# Altium PCB PCB_Palm_v2.2.PcbDoc (part 3 of 3)
Units mil, origin at the board's own origin, x right, y up, seen from the top; angles counter-clockwise.
Board outline 1773 x 1966 mil, 4 copper layers (Top Layer, Signal_1, Signal_2, Bottom Layer), stack 62.008 mil thick; 124 components, 104 nets, 490 pads, 277 vias.
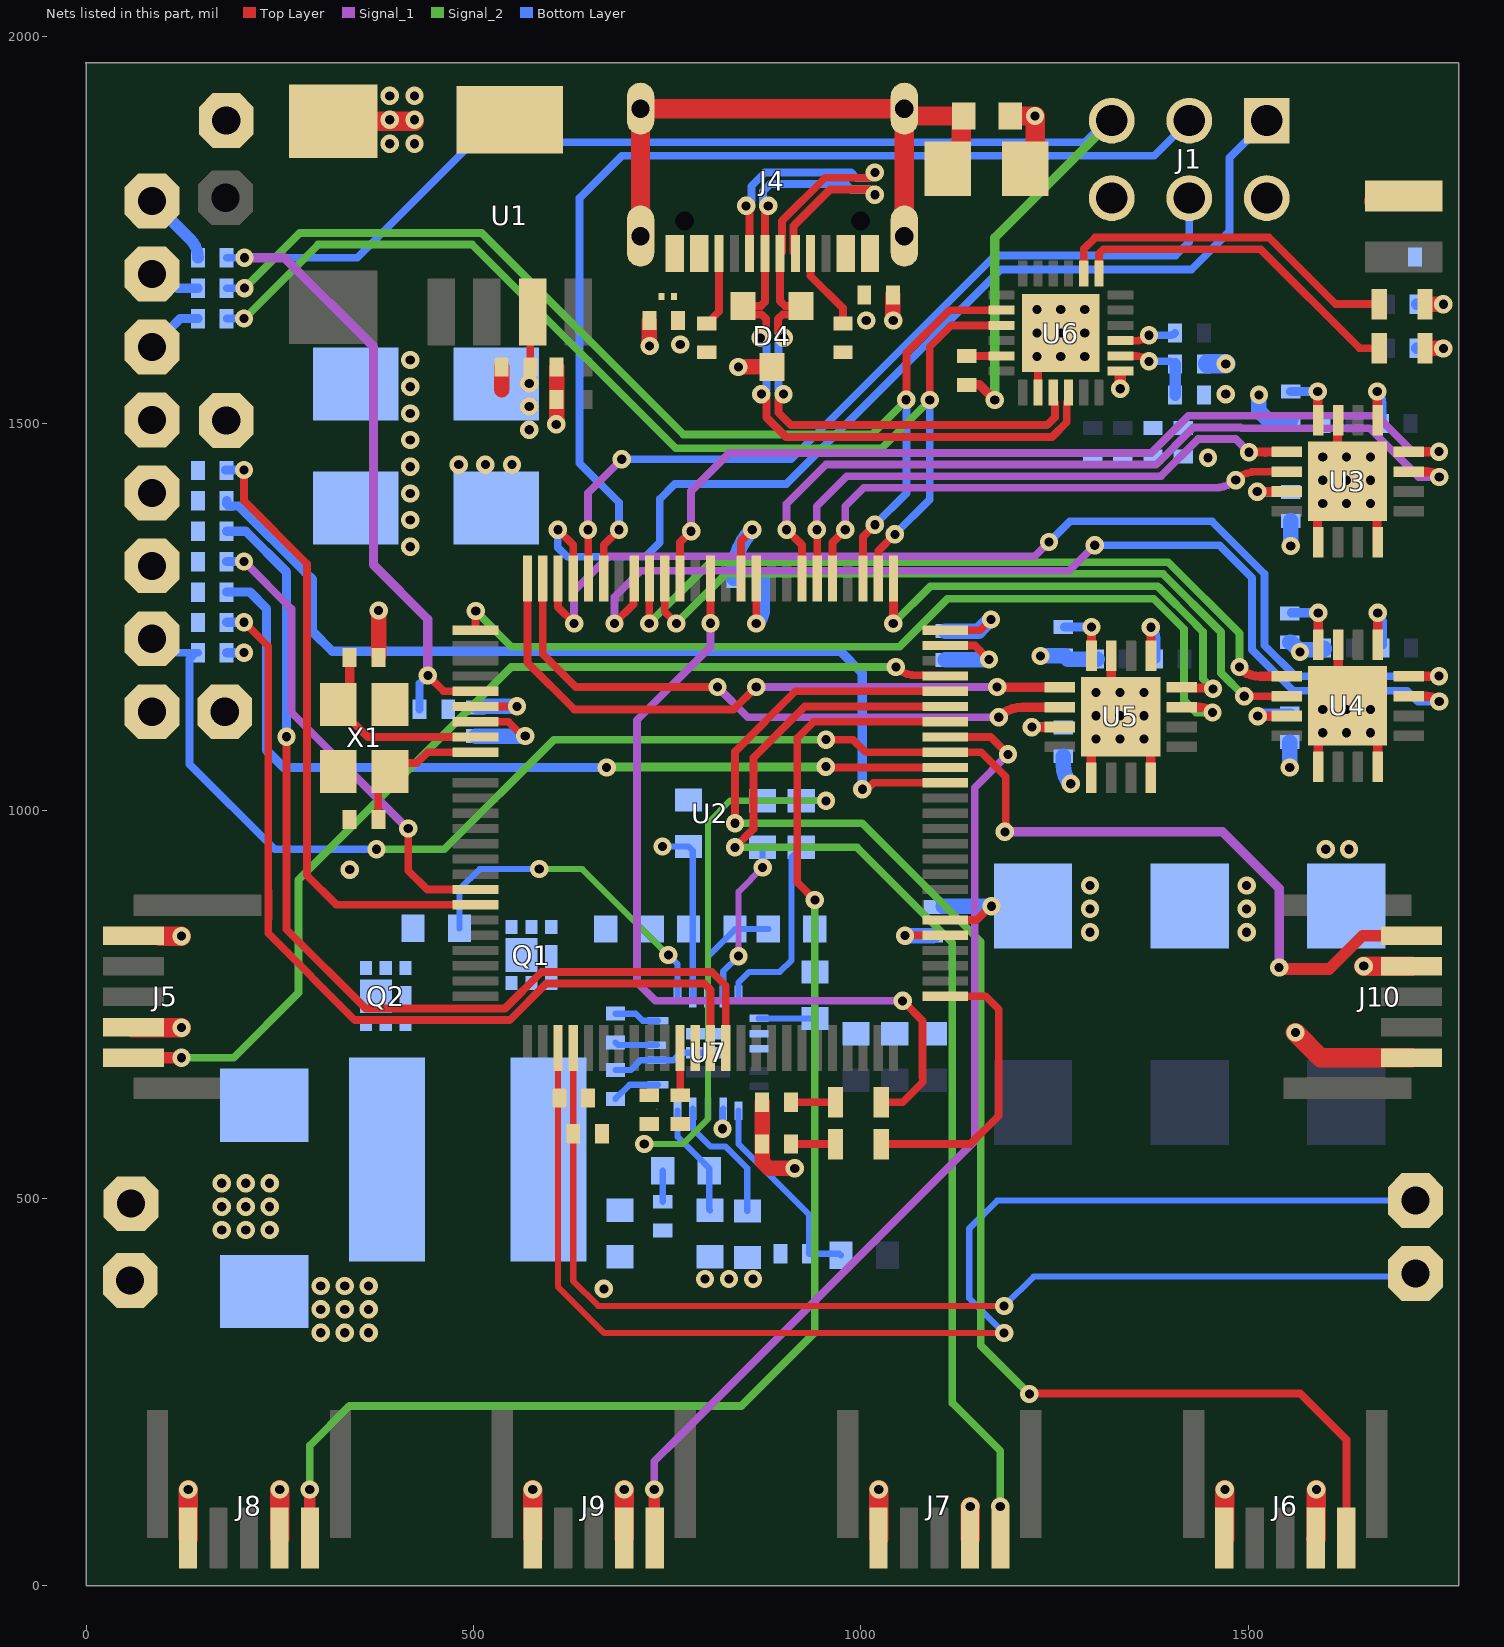
[diagram p4: the nets of this part, all layers, seen from the top]

## Via types
v1: diameter 23.62, hole 11.81, Top Layer to Bottom Layer, tented both sides, 277 vias

## Nets (pads, with @x,y where several pads share a name; then routed paths per layer and width w, separated by ;. In a path a pad name is that pad's centre, name@x,y a point inside that pad or via, vN(x,y) a via of type N, cw(c..) or ccw(c..) an arc to the next point about the centre after c; other vN are vias at no path point) (continued)
GND: C1.1 C2.1 C3.1 C4.2 C5.2 C6.2 C7.2 C8.2 C9.2 C10.2 C12.1 C13.1 C15.1 C16.1 C17.1 C19.1 C20.1 C21.1 C22.2 C23.2 C25.2 C26.2 C27.2 C28.2 C30.1 C31.2 C32.2 C33.2 C34.1 C35.1 C36.1 C39.2 C40.1 C41.2 C43.1 D1.2 D4.3 J1.6 J4.A1/B12 J4.B1/A12 J5.5 J6.5 J7.5 J8.5 J9.5 J10.5 J11.1 J21.1 J22.1 J25.1 Q1.4 Q1.7 R2.1 R3.1 R4.1 R8.2 R9.2 R24.1 R29.1 R33.1 R34.1 R35.1 R36.1 Ra.1 U1.5 U2.11 U2.32 U2.62 U2.81 U2.99 U3.1 U3.4 U3.11 U3.17 U4.1 U4.4 U4.11 U4.17 U5.1 U5.4 U5.11 U5.17 U6.2 U6.25 U7.7 U7.9 U7.10 U7.15 U7.24 X1.2 X1.4 | length 2748.2
  Top Layer w10: U2.32@502.85,1115.11 545.2,1115.11 563.7,1096.61 v1(567,1096.61) ; U2.11@845.37,1300.15 845.37,1348.37 v1(860,1363) ; U2.81@1109.15,859.2 1149.68,859.2 1167.48,877.01 v1(1168.81,877.01) ; U2.99@1109.15,1213.54 1147.31,1213.54 v1(1165.39,1195.45) ; v1(1227.25,1586.69) 1228.07,1586.69 U6.25@1228.7,1587.31 ; U6.2@1228.7,1540.07 U6.25@1228.7,1587.31 ; U6.25@1258.23,1616.84 U6.25@1228.7,1587.31
  Top Layer w12: U5.1@1297.67,1042.94 1297.67,1083.68 U5.17@1335.67,1121.68 ; U5.11@1323.47,1200.42 1323.47,1133.88 U5.17@1335.67,1121.68 ; U5.4@1374.47,1042.94 1374.47,1082.88 U5.17@1335.67,1121.68 ; U3.1@1589.58,1346.88 1589.58,1387.62 U3.17@1627.58,1425.62 ; U4.1@1590.32,1061.16 1590.32,1101.9 U4.17@1628.32,1139.9 ; U3.11@1615.38,1504.36 1615.38,1437.82 U3.17@1627.58,1425.62 ; U4.11@1616.12,1218.64 U4.11@1616.12,1214.58 1616.12,1152.1 U4.17@1628.32,1139.9 ; U3.4@1666.38,1346.88 1666.38,1386.82 U3.17@1627.58,1425.62 ; U4.4@1667.12,1061.16 1667.12,1101.1 U4.17@1628.32,1139.9
  Top Layer w20: C30.1@377.66,1200.44 v1(377.66,1258.66) ; 536.5,1543.5 C1.1@536.5,1573.08 ; v1@607,1501 ccw(c605.79,1502.21) v1@607.5,1502.21 ; v1@607.5,1499 C3.1@607.5,1531.08 C2.1@607.5,1573.08 ; v1@727,1600.5 C23.2@727,1633 ; v1(842,1573) 842.26,1573.26 D4.3@885.6,1573.26 ; R3.1@872.64,624.08 R4.1@872.64,570 872.64,547.65 881.64,538.65 v1(914.83,538.65) ; C22.2@1041.5,1666 1041.5,1633.5 v1(1042,1633)
  Top Layer w25: J5.5@95.96,838.34 v1(123.29,838.34) ; J8.5@131.9,60.97 v1(131.9,124) ; C10.2@312.16,1894 316,1890.16 C10.2@319,1890.16 v1@424,1890.16 ; U1.5@542.06,1890.16 U1.5@544,1892.1 ; J9.5@576.57,60.97 v1(576.57,124) ; J7.5@1023.23,60.97 v1(1023.23,124) ; Ra.1@1193,1897 v1(1225,1897) 1225,1842 C17.1@1212,1829 ; J6.5@1469.9,60.97 v1(1469.9,124) ; v1(1561,714) 1593.5,681.5 J10.5@1711.01,681.5
  Bottom Layer w8: v1(821.39,589.68) 821.95,590.25 821.95,615 U7.15@822.51,615.56
  Bottom Layer w20: C7.2@502.85,1096.61 v1(567,1096.61) ; C5.2@835.87,1300.15 835.87,1304.75 cw(c918.26,1304.75) C5.2@836.08,1310.55 ; C5.2@836.08,1300 C5.2@836.08,1310.55 ; v1(860,1363) ccw(c918.26,1304.75) 852.95,1354.97 ccw(c918.26,1304.75) C5.2@836.08,1310.55 ; 1106.33,877.01 v1(1168.81,877.01) ; C6.2@1109.17,1195.02 1109.39,1195.23 1165.18,1195.23 v1(1165.39,1195.45) ; v1(1232,1200) 1260.85,1200 C20.1@1261.41,1200.56 1262.91,1200.56 1267.41,1196.06 C19.1@1304.91,1196.06 ; v1(1514,1537) 1514,1516.22 1525.72,1504.5 C13.1@1555,1504.5 ; C16.1@1553.74,1217.72 1555.24,1217.72 1563.42,1209.53 1566.82,1206.13 v1(1566.82,1205) 1567.8,1205 1570.52,1207.72 1597.24,1207.72 1598.24,1208.72 C15.1@1598.24,1210.22
  Bottom Layer w25: R24.1@1448,1577 v1(1471,1577)
  other v1: 303,326.43 333.88,326.43 364.75,326.43 303,356.59 333.88,356.59 364.75,356.59 303,386.75 333.88,386.75 364.75,386.75 799,395.75 829.88,395.75 860.75,395.75 1295.75,843.43 1498,843.43 1295.75,873.59 1498,873.59 1295.75,903.75 1498,903.75 340.32,924.17 1600.14,950.47 1630.3,950.47 1303.59,1092.75 1334.47,1092.75 1365.34,1092.75 1596.25,1100.9 1627.13,1100.9 1658,1100.9 1303.59,1122.9 1334.47,1122.9 1365.34,1122.9 1596.25,1131.06 1627.13,1131.06 1658,1131.06 1303.59,1153.06 1334.47,1153.06 1365.34,1153.06 1596.25,1396.69 1627.13,1396.69 1658,1396.69 1596.25,1426.84 1627.13,1426.84 1658,1426.84 1448.13,1455.8 1596.25,1457 1627.13,1457 1658,1457 607,1499 1258.13,1586.69 1289,1586.69 727.5,1600 1227.25,1616.84 1258.13,1616.84 1289,1616.84 1227.25,1647 1258.13,1647 1289,1647 392,1861.25 424,1861.25 392,1892.12 424,1892.12 392,1923 424,1923
LED_PIN: LED2.1 U2.76 | length 371.4
  Top Layer w10: LED2.1@1035.07,570 1141.54,570 1178,606.46 1178,744 1161.22,760.78 U2.76@1109.15,760.78
MEGA_MISO: J1.1 U2.22 | length 1335.7
  Top Layer w10: v1(609,1363) 628.84,1343.17 U2.22@628.84,1300.15
  Bottom Layer w10: v1(609,1363) 609,1340 621,1328 722,1328 740.5,1346.5 740.5,1402.5 760,1422 904,1422 1181,1699 1427,1699 1476,1748 1476,1843 J1.1@1524,1891
MEGA_MOSI: J1.4 U2.21 | length 1077.2
  Top Layer w10: v1@648.26,1363 648.26,1300.41 U2.21@648.52,1300.15
  Signal_1 w10: v1(648,1363) 648,1410.47 v1(691.53,1454)
  Bottom Layer w10: v1(691.53,1454) 910.35,1454 1173.35,1717 1406.65,1717 1424,1734.35 J1.4@1424,1791
MEGA_RST: C24.2 C29.2 J1.5 R1.2 U2.30 | length 2465.9
  Top Layer w10: v1(441.23,1174.9) 441.23,1174.77 461.52,1154.48 U2.30@502.85,1154.48
  Top Layer w12: C29.2@1137,1550 1153.29,1550 v1@1176.87,1526.41
  Signal_1 w12: v1(204.5,1714) 256,1714 371,1599 371,1317.69 441.23,1247.45 v1(441.23,1174.9)
  Signal_2 w12: v1@1173,1539 1173,1740 J1.5@1324,1891
  Bottom Layer w10: C24.2@181.5,1714 v1(204.5,1714) 350,1714 499.04,1863.04 1288.99,1863.04 1316.95,1891 J1.5@1324,1891 ; R1.2@430.5,1131 430.5,1164.31 441.1,1174.9 v1(441.23,1174.9)
  other v1: 1173,1530.29
MEGA_SCK: J1.3 U2.20 | length 1348.6
  Top Layer w10: U2.20@668.21,1300.15 668.21,1343.17 v1(688.04,1363)
  Bottom Layer w10: v1(688.04,1363) 688.04,1397.96 637,1449 637,1791 691.75,1845.75 1378.75,1845.75 J1.3@1424,1891
MOTOR1_CLOSE: U2.6 U3.13 | length 741.4
  Top Layer w10: U2.6@943.8,1300.15 v1@943.8,1362.48
  Top Layer w12: v1@1501.21,1463.21 1522.21,1463.21 ; 1522,1463 1522.21,1463.21 ; U3.13@1549.05,1463.21 1522.21,1463.21
  Signal_1 w10: v1(943.28,1363) 943.28,1393.28 982,1432 1387.43,1432 1435.43,1480 1484,1480 v1(1501,1463)
MOTOR1_OPEN: U2.5 U3.14 | length 684.4
  Top Layer w10: U2.5@963.48,1300.15 963.48,1346.44 v1(980.04,1363) ; v1(1484,1427) cw(c1510.12,1400.88) 1510.12,1437.82 U3.14@1549.58,1437.82
  Signal_1 w10: v1(980.04,1363) 980.04,1393.04 1004,1417 1457.03,1417 ccw(c1457.03,1457.97) 1473.99,1420.68 ccw(c1457.03,1457.97) v1@1483.85,1427
MOTOR1_SENSE: J5.1 U2.97 | length 1346.8
  Top Layer w10: v1(1045.27,1185.73) ccw(c1071,1211.45) 1071,1175.07 1108.24,1175.07 U2.97@1109.15,1174.17
  Top Layer w15: J5.1@60.79,681.49 v1@124.29,681.49
  Signal_2 w10: v1(123.29,681.49) 190.49,681.49 274.28,765.28 274.28,911.05 548.95,1185.73 v1(1045.27,1185.73)
MOTOR2_CLOSE: U2.15 U3.8 | length 1183.1
  Top Layer w10: U2.15@766.63,1300.15 766.63,1346.63 v1(781,1361)
  Top Layer w12: U3.8@1706.32,1463.42 U3.8@1706.61,1463.71 ; U3.8@1707.06,1463.42 v1@1746.16,1463.42
  Signal_1 w10: v1(781,1361) 781,1413 830,1462 1375,1462 1423,1510 1666,1510 1712.29,1463.71 v1(1746.45,1463.71)
MOTOR2_OPEN: U2.7 U3.7 | length 1057.2
  Top Layer w10: v1(904.28,1363) 924.11,1343.17 U2.7@924.11,1300.15
  Top Layer w12: U3.7@1706.32,1437.82 U3.7@1707.21,1436.93 ; U3.7@1707.06,1437.82 1730.28,1437.82 cw(c1730.28,1414.54) v1(1746.74,1431)
  Signal_1 w10: v1(904.28,1363) 904,1363.28 904,1396 955,1447 1325,1447 1381.21,1447 1428.21,1494 1429.21,1495 1490.21,1495 1491.21,1494 1657,1494 1720,1431 v1(1746.74,1431)
MOTOR2_SENSE: J6.1 U2.96 | length 1948.7
  Top Layer w10: v1(837.75,984) 837.75,1076.75 915.48,1154.48 U2.96@1109.15,1154.48 ; v1(1217.62,247.38) 1218.24,248 1567.34,248 1626.88,188.46 J6.1@1626.88,60.45
  Signal_2 w10: v1(837.75,984) 1002,984 1155,831 1155,310 v1(1217.62,247.38)
MOTOR3_CLOSE: U2.17 U4.13 | length 1000.1
  Top Layer w10: v1(727,1242) U2.17@727,1299.89
  Top Layer w12: v1(1488.85,1185.85) 1488.85,1185 1488,1185 ccw(c1515.44,1212.44) 1515.44,1173.64 U4.13@1549.58,1173.64
  Signal_2 w10: v1(727,1242) 806,1321 1397,1321 1488.85,1229.15 v1(1488.85,1185.85)
MOTOR3_OPEN: U2.16 U4.14 | length 975
  Top Layer w10: U2.16@746.95,1300.15 746.95,1257.06 v1(762,1242) ; v1(1495,1148) U4.14@1549.57,1148.02
  Signal_2 w10: v1(762,1242) 826,1306 1390,1306 1465,1231 1465,1178 v1(1495,1148)
MOTOR3_SENSE: J7.1 U2.95 | length 1527.1
  Top Layer w10: v1(837.75,953) 861.5,976.75 861.5,1068.5 927.8,1134.8 U2.95@1109.15,1134.8
  Top Layer w15: J7.1@1180.08,60.32 1180.16,60.4 1180.16,102.11 v1(1180.08,102.19)
  Signal_2 w10: v1(837.75,953) 995,953 1118.08,829.92 1118.08,235.92 1180.08,173.92 v1(1180.08,102.19)
MOTOR4_CLOSE: U2.23 U4.8 | length 1438.5
  Top Layer w10: U2.23@609.15,1300.15 609.15,1262.83 v1(629.98,1242)
  Top Layer w12: U4.8@1707.06,1173.64 v1@1746.16,1173.64
  Signal_1 w10: v1(629.98,1242) 629.98,1283.98 674.7,1328.7 1224.7,1328.7 v1(1243,1347)
  Bottom Layer w10: v1(1243,1347) 1270,1374 1453.21,1374 1521,1306.21 1521,1214 1561.07,1173.93 v1(1746.45,1173.93)
MOTOR4_OPEN: U2.18 U4.7 | length 1374.8
  Top Layer w10: v1(682,1242) 706.67,1266.67 706.67,1299.24 U2.18@707.58,1300.15
  Top Layer w12: U4.7@1707.06,1148.04 1730.28,1148.04 cw(c1730.28,1124.75) v1(1746.74,1141.22)
  Signal_1 w10: v1(682,1242) 682,1276 716,1310 1269,1310 v1(1302,1343)
  Bottom Layer w10: v1(1302,1343) 1463,1343 1505,1301 1505,1208 1558,1155 1705.39,1155 1719.17,1141.22 v1(1746.74,1141.22)
MOTOR4_SENSE: J8.1 U2.94 | length 1810.4
  Top Layer w10: v1(940.68,885.01) 918,907.7 918,1094 939.11,1115.11 U2.94@1109.15,1115.11
  Top Layer w15: J8.1@288.75,60.32 v1@288.75,125
  Signal_2 w10: v1(288.75,124) 288.75,180.75 340,232 846,232 940.68,326.68 v1(940.68,885.01)
MOTOR5_CLOSE: U2.25 U5.13 | length 832.5
  Top Layer w10: U2.25@569.78,1300.15 569.78,1191.22 630,1131 836.06,1131 v1(865.06,1160)
  Top Layer w12: v1@1176.52,1159.48 U5.13@1256.93,1159.48
  Signal_1 w10: v1(865.06,1160) v1(1176,1160)
MOTOR5_OPEN: U2.24 U5.14 | length 802.2
  Top Layer w10: U2.24@589.47,1300.15 589.47,1202.53 632,1160 v1(815,1160)
  Top Layer w12: v1(1178,1121) cw(c1209.24,1089.76) 1209.24,1133.94 U5.14@1256.87,1133.94
  Signal_1 w10: v1(815,1160) 854,1121 v1(1178,1121)
MOTOR5_SENSE: J9.1 U2.93 | length 1291.9
  Top Layer w10: U2.93@1109.15,1095.43 1167.58,1095.43 v1(1190,1073)
  Top Layer w15: J9.1@733.42,60.32 v1(733.42,124)
  Signal_1 w10: v1(733.42,124) 733.42,160.42 763,190 1147,574 1147,1030 v1(1190,1073)
MOTOR6_CLOSE: U2.1 U5.8 | length 623.1
  Top Layer w12: v1(1042,1242) 1042.22,1242.22 U2.1@1042.22,1300.15 ; U5.8@1414.41,1159.48 1415.15,1158.74 1454.26,1158.74 1455,1158 v1(1454.58,1157.58)
  Signal_2 w10: v1(1042,1242) 1090,1290 1383,1290 1384,1289 1384.21,1289 1432.34,1240.87 1432.34,1240.66 1441.59,1231.41 1441.59,1170.57 v1(1454.58,1157.58)
MOTOR6_OPEN: U2.26 U5.7 | length 1167.5
  Top Layer w10: v1(503,1258) 502.85,1257.85 U2.26@502.85,1233.22 U2.26@503.21,1233.58
  Top Layer w12: U5.7@1414.41,1133.88 1437.62,1133.88 cw(c1437.62,1110.6) v1(1454.08,1127.06)
  Signal_2 w10: v1(503,1258) 549,1212 1050,1212 1112,1274 1378,1274 1417.34,1234.66 1417.34,1142.55 1432.83,1127.06 v1@1444.08,1127.06
MOTOR6_SENSE: J10.1 J23.1 R16.1 U2.92 | length 2140
  Top Layer w10: v1(955,1092) 990,1092 1006.26,1075.74 U2.92@1109.15,1075.74 1155.26,1075.74 1187,1044 1187,974 v1(1186,973)
  Top Layer w15: v1(1540,798) 1542,796 1604.68,796 1647.67,838.99 J10.1@1712.35,838.99
  Signal_1 w12: v1(1186,973) 1466.98,973 1540,899.98 v1(1540,798)
  Signal_2 w10: v1(374.94,950.49) 462.49,950.49 604,1092 v1(955,1092)
  Bottom Layer w10: J23.1@85,1222.29 99.79,1222.29 118.07,1204 R16.1@141.57,1204 ; R16.1@144.5,1204 R16.1@141.57,1204 ; v1(374.94,950.49) 243.51,950.49 133.57,1060.43 133.57,1196 R16.1@141.57,1204
MUSCLE_SENSE1: R13.1 U2.91 | length 1129.4
  Top Layer w10: v1(954.97,1057.2) 956.12,1056.06 U2.91@1109.15,1056.06
  Signal_2 w12: v1(672,1056.06) 672.57,1056.63 954.4,1056.63 v1(954.97,1057.2)
  Bottom Layer w12: R13.1@181.5,1282.47 211.53,1282.47 233,1261 233,1078.38 255.32,1056.06 v1(672,1056.06)
MUSCLE_SENSE2: R11.1 U2.90 | length 1214.4
  Top Layer w10: v1(1002,1028) 1008,1028 1016.37,1036.37 U2.90@1109.15,1036.37
  Bottom Layer w12: R11.1@181.5,1400.17 181.5,1396.67 184.5,1393.67 197.38,1393.67 283,1308.04 292.35,1298.69 292.35,1231.45 317.8,1206 973.73,1206 1002,1177.73 v1(1002,1028)
NetC11_1: C11.1 U3.9 | length 79.9
  Top Layer w12: U3.9@1666.58,1504.36 v1(1666.58,1541.36)
  Bottom Layer w12: v1(1666.58,1541.36) cw(c1652.3,1527.07) 1672.5,1527.07 C11.1@1672.5,1500
NetC13_2: C13.2 U3.12 | length 71.6
  Top Layer w12: U3.12@1589.78,1504.36 v1(1589.78,1541.36)
  Bottom Layer w12: C13.2@1555.14,1541.36 v1(1589.78,1541.36)
NetC14_1: C14.1 U4.9 | length 84
  Top Layer w12: U4.9@1667.32,1214.58 v1(1667.32,1255.64)
  Bottom Layer w12: v1(1667.32,1255.64) cw(c1653.04,1241.35) 1673.24,1241.35 C14.1@1673.24,1214.28
NetC16_2: C16.2 U4.12 | length 71.6
  Top Layer w12: U4.12@1590.52,1218.64 v1(1590.52,1255.64)
  Bottom Layer w12: C16.2@1555.88,1255.64 v1(1590.52,1255.64)
NetC18_1: C18.1 U5.9 | length 80.3
  Top Layer w12: v1(1374.39,1237.14) 1374.67,1237.14 U5.9@1374.67,1200.42
  Bottom Layer w12: v1(1374.39,1237.14) 1374.67,1237.42 cw(c1360.38,1223.13) 1380.58,1223.13 C18.1@1380.58,1196.06
NetC20_2: C20.2 U5.12 | length 71.6
  Top Layer w12: U5.12@1297.87,1200.42 v1(1297.87,1237.42)
  Bottom Layer w12: C20.2@1263.23,1237.42 v1(1297.87,1237.42)
NetC24_1: C24.1 J17.1 | length 96.6
  Bottom Layer w15: J17.1@85,1787.43 134.65,1737.78 cw(c110.88,1714) C24.1@144.5,1714
NetC29_1: C29.1 U6.23 | length 44.5
  Top Layer w10: C29.1@1137,1587.31 U6.23@1181.46,1587.31
NetC37_1: C37.1 U7.22 | length 54.9
  Bottom Layer w8: C37.1@683.33,701.24 686.82,697.75 U7.22@736.78,697.75
NetC37_2: C37.2 L1.1 Q1.1 Q1.2 Q1.5 Q1.6 Q1.8 Q2.4 Q2.7 U7.23 | length 58.7
  Bottom Layer w8: C37.2@683.33,738.24 709.64,738.24 718.64,729.24 U7.23@738.26,729.24
NetC38_1: C38.1 L1.2 U7.21 U7.25 | length 128.8
  Bottom Layer w8: C38.1@683.33,665.4 703.02,665.4 715.68,678.06 U7.21@736.78,678.06 757.83,678.06 767.67,687.9 U7.25@802.83,687.9
NetC38_2: C38.2 U7.20 | length 62.5
  Bottom Layer w8: C38.2@683.33,628.4 701.49,646.56 U7.20@738.26,646.56
NetC42_1: C42.1 R36.2 | length 40
  Bottom Layer w8: R36.2@744.48,495.51 C42.1@744.48,535.51
NetC42_2: C42.2 C43.2 U7.18 | length 143
  Bottom Layer w8: U7.18@763.46,613.1 763.46,579.53 C42.2@804.48,538.51 ; C42.2@804.48,535.51 804.48,485.58 C43.2@805.55,484.51
NetJ4_A5: J4.A5 R8.1 | length 96.4
  Top Layer w10: J4.A5@935,1708 935,1691 977,1649 R8.1@977,1629
NetJ4_B5: J4.B5 R9.1 | length 97.2
  Top Layer w10: R9.1@801,1629 817.1,1645.1 J4.B5@817.1,1719.5
NetJ14_1: J14.1 R18.2 | length 67.2
  Bottom Layer w12: J14.1@85,1693.22 99.2,1693.22 117.68,1674.75 R18.2@144.5,1674.75
NetJ15_1: J15.1 R10.2 R11.2 R12.2
NetJ16_1: J16.1 R19.2 | length 74.6
  Bottom Layer w12: J16.1@85,1599.02 121.48,1635.5 R19.2@144.5,1635.5
NetJ18_1: J18.1 R13.2 R14.2 R15.2
NetLED1_2: LED1.2 R3.2 | length 57.8
  Top Layer w10: R3.2@909.64,624.08 909.72,624 LED1.2@967.42,624
NetLED2_2: LED2.2 R4.2 | length 57.8
  Top Layer w10: R4.2@909.64,570 LED2.2@967.42,570
NetLED3_1: LED3.1 R21.2 | length 59.3
  Top Layer w20: LED3.1@1728.3,1654.16 1728.46,1654 v1(1752,1654) v1@1753,1654
  Bottom Layer w15: R21.2@1717.5,1654 v1(1752,1654)
NetLED4_1: LED4.1 R22.2 | length 59.3
  Top Layer w20: LED4.1@1728.3,1597.16 1728.38,1597.08 1752.92,1597.08 v1@1753,1597
  Bottom Layer w15: R22.2@1717.5,1597 v1(1752,1597)
NetQ1_3: Q1.3 R27.2
NetQ2_3: Q2.3 R26.2
NetR5_2: R5.2 U3.15 | length 79.8
  Top Layer w12: v1(1511.73,1412.11) 1548.73,1412.11 U3.15@1548.84,1412.22
  Bottom Layer w12: v1(1511.73,1412.11) R5.2@1554.39,1412.11
NetR6_2: R6.2 U4.15 | length 80.7
  Top Layer w12: v1(1512.47,1122.39) U4.15@1549.47,1122.39
  Bottom Layer w12: v1(1512.47,1122.39) cw(c1522.13,1112.73) 1522.13,1126.39 R6.2@1555.13,1126.39
NetR7_2: R7.2 U5.15 | length 78.7
  Top Layer w12: v1(1220.82,1108.17) U5.15@1256.82,1108.17
  Bottom Layer w12: v1@1219.82,1108.17 v1(1220.82,1108.17) R7.2@1262.47,1108.17
NetR20_1: R20.1 U6.9 | length 73.4
  Top Layer w10: U6.9@1335,1607 1355.1,1607 ccw(c1355.1,1630.9) v1(1372,1614)
  Bottom Layer w10: v1(1372,1614) 1398.87,1614 ccw(c1398.87,1623.7) R20.1@1405.73,1616.84
NetR23_2: R23.2 R24.2 U6.8 | length 113.5
  Top Layer w10: U6.8@1335,1587.31 1355.1,1587.31 cw(c1355.1,1563.42) v1(1372,1580.31)
  Bottom Layer w10: v1(1372,1580.31) 1397.35,1580.31 cw(c1397.35,1568.46) R24.2@1405.73,1576.84
  Bottom Layer w15: R23.2@1405.73,1536.84 R24.2@1405.73,1576.84
NetR26_1: R26.1 U7.2 | length 433.1
  Signal_2 w8: v1(585,925) 640.64,925 v1(751.64,814)
  Bottom Layer w8: R26.1@482,848.51 482,899 508,925 v1(585,925) ; v1(751.64,814) 763.46,802.18 U7.2@763.46,762.71
NetR27_1: R27.1 U7.1
NetR28_1: R28.1 R29.2 U7.4 | length 144.7
  Bottom Layer w8: U7.4@802.83,760.25 802.83,812.59 R28.1@837.75,847.51 R29.2@880.68,847.51
NetR30_2: R30.2 U7.5 | length 213.8
  Signal_1 w8: v1(842.2,812.59) 842.2,895.9 v1(873.3,927)
  Bottom Layer w8: U7.5@822.51,760.25 822.51,792.9 v1(842.2,812.59) ; v1(873.3,927) R30.2@873.3,953
NetR31_2: R31.2 U7.6 | length 247.2
  Bottom Layer w8: U7.6@842.2,762.71 842.2,778.6 855.8,792.2 895.68,792.2 910.68,807.2 910.68,940.5 R31.2@923.18,953
NetR32_1: R32.1 R34.2 U7.14 | length 264.2
  Bottom Layer w8: U7.14@842.2,613.1 842.2,569.89 933.33,478.76 R34.2@933.33,428.51 972.33,428.51 R32.1@974.33,426.51
NetR33_2: R33.2 U7.8 | length 72.3
  Bottom Layer w8: U7.8@868.38,732.2 R33.2@940.68,732.2
NetR35_2: R35.2 U7.17 | length 172.6
  Bottom Layer w8: U7.17@783.14,615.56 783.14,589.68 806.15,566.68 825.53,566.68 853.55,538.65 R35.2@853.55,483.51
PALM_LED: LED1.1 U2.13 | length 1093.5
  Top Layer w10: v1(806,1242.26) U2.13@806,1300.15 ; LED1.1@1026.47,624 1054,624 1080,650 1080,656 1079.62,656.38 1079.62,729.25 v1(1054,754.87)
  Signal_1 w10: v1(806,1242.26) 806,1212 711,1117 711,778.93 735.05,754.87 v1(1054,754.87)
PC0: J13.1 R25.2 U2.53 | length 1653.1
  Top Layer w8: 609,644 609,629.5 609,386 669,326 v1(1185,326) ; 609.15,644.15 U2.53@609.15,693.85
  Bottom Layer w8: v1(1185,326) 1140,371 1140,461 1176,497 J13.1@1716,497
PC1: J12.1 R17.2 U2.54 | length 1418.6
  Top Layer w8: U2.54@628.84,693.85 R17.2@628.84,583.5 628.84,393.16 661,361 v1(1185,361)
  Bottom Layer w8: v1(1185,361) 1223,399 1712,399 J12.1@1716,403
PG/CCN: C41.1 R30.1 R31.1 U7.19 | length 723.9
  Signal_2 w8: v1(720.45,570.19) 720.63,570 736,570 770.43,570 802.96,602.53 802.96,984.96 831,1013 v1(955,1013)
  Bottom Layer w8: R30.1@873.3,1013 R31.1@923.18,1013 v1(955,1013)
PRGM_RX: R18.1 U2.3 U6.20 | length 1493.1
  Top Layer w10: U2.3@1002.85,1300.15 1002.85,1354.04 v1(1018.2,1369.39) ; v1(1058.58,1530.71) 1059,1531.13 1059,1591 1114.37,1646.37 U6.20@1181.46,1646.37
  Signal_2 w10: v1(204.5,1674.75) 275.75,1746 510.78,1746 770.78,1486 1014.71,1486 1058.58,1529.86 v1(1058.58,1530.71)
  Bottom Layer w10: R18.1@181.5,1674.75 v1(204.5,1674.75) ; v1(1018.2,1369.39) 1059,1410.19 1059,1530.29 v1(1058.58,1530.71)
PRGM_TX: R19.1 U2.2 U6.21 | length 1511.9
  Top Layer w10: U2.2@1022.54,1300.15 1022.54,1335.54 v1(1044,1357) ; v1(1089,1530.29) 1089,1599.06 1116.63,1626.68 U6.21@1181.46,1626.68
  Signal_2 w10: v1(204,1635.5) 299.5,1731 498.66,1731 761.4,1468.25 1026.97,1468.25 v1(1089,1530.29)
  Bottom Layer w10: R19.1@181.5,1635.5 v1(204,1635.5) ; v1(1044,1357) 1089,1402 v1(1089,1530.29)
RXD3: R15.1 U2.63 | length 1152.3
  Top Layer w10: v1(204,1243.53) 235.04,1212.49 235.04,896.16 235.35,895.86 235.35,860.84 235.04,860.54 235.04,841.96 347,730 547,730 594.19,777.19 797.81,777.19 806,769 U2.63@806,693.85
  Bottom Layer w12: R15.1@181.65,1243.38 v1@203.85,1243.38
RXLED: LED4.2 U6.13 | length 442.7
  Top Layer w10: U6.13@1307.44,1693.61 1307.44,1719.14 1313.3,1725 1516,1725 1643.84,1597.16 LED4.2@1669.24,1597.16
SCL: R14.1 U2.43 | length 606.1
  Top Layer w10: v1(415.91,977.32) 415.91,922.95 440.29,898.57 U2.43@502.85,898.57
  Signal_1 w10: v1(204,1322) 265.07,1260.93 265.07,1127.25 v1@415,977.32
  Bottom Layer w10: R14.1@181.5,1321.7 R14.1@181.65,1321.85 ; v1@203.85,1321.85 v1(204,1322)
  Bottom Layer w12: R14.1@181.65,1321.85 v1@203.85,1321.85
SDA: R12.1 U2.44 | length 814
  Top Layer w10: v1(204,1440) 204,1400 285.04,1318.96 285.04,917.15 323.31,878.89 U2.44@502.85,878.89
  Bottom Layer w12: R12.1@180.1,1440 v1(204,1440)
SHELL: C17.2 J4.S1 J4.S2 J4.S3 J4.S4 Ra.2 | length 830.1
  Top Layer w25: J4.S2@712,1910 715.72,1906.28 J4.S1@715.72,1741.94 ; J4.S2@715.72,1906.5 J4.S3@1056.28,1906.5 J4.S3@1056.28,1901.82 ; J4.S4@1056.28,1741.94 J4.S3@1056.28,1901.82 ; C17.2@1112,1829 1129.5,1846.5 1129.5,1891 1133,1894.5 Ra.2@1133,1897 1061.1,1897 J4.S3@1056.28,1901.82
TXD3: R10.1 U2.64 | length 1283.8
  Top Layer w10: v1@258.65,1102.81 v1(258.65,1095.81) 258.65,847.35 361,745 540.79,745 587.98,792.19 807.81,792.19 825.69,774.31 U2.64@825.69,693.85
  Bottom Layer w12: R10.1@181.5,1360.93 206.07,1360.93 258.65,1308.35 v1(258.65,1095.81)
TXLED: LED3.2 U6.14 | length 454.8
  Top Layer w10: U6.14@1287.76,1693.61 1287.76,1725.35 1302.41,1740 1527,1740 1612.84,1654.16 LED3.2@1669.24,1654.16
USB_D_N: D4.2 J4.A7 J4.B7 U6.4 | length 1123.4
  Top Layer w10.25: v1(870.6,1610.6) 877.97,1617.97 877.97,1634.98 871.97,1640.98 859.21,1640.98 D4.2@848.2,1652 871.17,1652 876.16,1656.99 J4.A7@876.16,1719.5 876.16,1776.53 v1(880.63,1781) ; v1(871.69,1538) 878.38,1531.31 878.38,1507.68 903.31,1482.75 1246.92,1482.75 1265.85,1501.68 1265.85,1527.03 1268.07,1529.24 U6.4@1268.07,1540.07 ; J4.B7@915.53,1719.5 913.31,1721.71 913.31,1755 960.31,1802 1015.31,1802 1022,1795.31 v1(1018.19,1795.31)
  Bottom Layer w10.25: v1(870.6,1610.6) 878.38,1602.82 878.38,1544.69 v1(871.69,1538) ; v1(880.63,1781) 873.94,1787.69 873.94,1800 882.94,1809 957,1809 957.16,1808.84 980.84,1808.84 987.68,1802 1011.5,1802 v1(1018.19,1795.31)
USB_D_P: D4.1 J4.A6 J4.B6 U6.3 | length 1121.9
  Top Layer w10.25: v1(852,1781) 856.47,1776.53 J4.B6@856.47,1719.5 ; v1(900.31,1538) 893.63,1531.31 893.63,1514 909.63,1498 1240.6,1498 1250.6,1508 1250.6,1527.03 1248.39,1529.24 U6.3@1248.39,1540.07 ; v1(900.6,1610.6) 893.22,1617.97 893.22,1634.98 899.23,1640.98 911.98,1640.98 D4.1@923,1652 902,1652 895.84,1658.16 J4.A6@895.84,1719.5 898.06,1721.71 898.06,1761.32 953.99,1817.25 1015.31,1817.25 1022,1823.94 v1(1018.19,1823.94)
  Bottom Layer w10.25: v1(852,1781) 858.69,1787.69 858.69,1806.32 876.62,1824.25 987.32,1824.25 994.16,1817.41 994,1817.25 1011.5,1817.25 v1(1018.19,1823.94) ; v1(900.31,1538) 893.63,1544.69 893.63,1603.63 v1(900.6,1610.6)
VCC: C4.1 C5.1 C6.1 C7.1 C8.1 C9.1 D2.2 D3.2 J1.2 J3.1 J5.2 J6.2 J7.2 J8.2 J9.2 J10.2 J19.1 J20.1 R1.1 R5.1 R6.1 R7.1 R16.2 R17.1 R25.1 U2.10 U2.31 U2.61 U2.80 U2.100 | length 1028.6
  Top Layer w10: U2.31@502.85,1134.8 556.16,1134.8 v1(556.16,1135) ; U2.61@765.73,694.76 U2.61@766.63,693.85 767,694.22 C8.1@767,633 ; v1(865.06,1242) U2.10@865.06,1300.15 ; v1(1057,839) 1057.52,839.52 U2.80@1109.15,839.52 ; U2.100@1109.15,1233.22 1154.22,1233.22 v1(1168,1247)
  Top Layer w25: J5.2@60.26,720.24 v1(123.29,720.24) ; J8.2@250,60.97 v1(250,124) ; J9.2@694.67,60.97 v1(694.67,124) ; J7.2@1141.33,60.97 v1(1141.33,102.19) ; J6.2@1587.35,60.32 1588,60.97 v1(1588,124) ; v1(1649.3,799.61) J10.2@1711.01,799.61 ; J3.1@1662,1787 1671,1796 J3.1@1701,1796
  Bottom Layer w12: R16.2@181.65,1204.15 v1@203.85,1204.15
  Bottom Layer w20: C7.1@504.24,1135 v1(556.16,1135) ; v1(865.06,1242) ccw(c846.19,1260.87) 872.87,1260.87 C5.1@872.87,1300.15 ; v1@1058.99,837.01 1060.99,839.01 C4.1@1093.83,839.01 ; C6.1@1109.17,1232.02 1152.04,1232.02 1167.02,1247 v1(1168,1247) ; R7.1@1261.41,1070.56 1261.41,1058.16 ccw(c1294.16,1058.16) 1263.91,1045.61 ccw(c1294.16,1058.16) 1266.75,1040.23 ccw(c1294.16,1058.16) v1(1271,1035) ; v1(1553.74,1056.15) R6.1@1553.74,1088.72 ; v1(1555,1341.93) R5.1@1555,1374.5
  other v1: 668.38,383.05 204,1204.3 418.42,1340.96 418.42,1375.39 418.42,1409.81 418.42,1444.24 418.42,1478.66 418.42,1513.09 418.42,1547.51 418.42,1581.94
VCC#: C1.2 D3.1 U1.3 | length 81
  Top Layer w10: C1.2@573.5,1563.08 U1.3@573.5,1644.03
  other v1: 572,1492 572,1521.92 572,1551.84
VIN_6V: C39.1 C40.2 J2.1 Q2.1 Q2.2 Q2.5 Q2.6 Q2.8 R28.2 U7.3 | length 229.6
  Bottom Layer w8: v1(744.17,954) C40.2@777.75,954 783.14,948.61 U7.3@783.14,760.25
  other v1: 175.25,459 206.12,459 237,459 175.25,489.16 206.12,489.16 237,489.16 175.25,519.31 206.12,519.31 237,519.31
VUSB: C22.1 C23.1 C25.1 C26.1 D1.1 D2.1 J4.A4/B9 J4.B4/A9 R23.1 U6.7 | length 22.8
  Top Layer w10: C22.1@1003,1667.5 C22.1@1004.5,1666
  Top Layer w15: v1(1335,1545) U6.7@1335,1565.63
  other v1: 481,1447 515.43,1447 549.85,1447 1471,1538 767,1602 1007,1633
X#1: C21.2 U2.34 X1.1 | length 189
  Top Layer w10: C21.2@377.32,988.96 377.32,1035.91 403.38,1061.96 427.2,1061.96 440.98,1075.74 U2.34@502.85,1075.74
X#2: C30.2 U2.33 X1.3 | length 251.4
  Top Layer w10: X1.3@331.42,1127.49 363.48,1095.43 U2.33@502.85,1095.43
  Top Layer w12: X1.3@325.36,1137.49 340.32,1152.45 C30.2@340.32,1197.94
pads on no net: J4.A8 J4.B8 J4.MH J5.MP1 J5.MP2 J6.MP1 J6.MP2 J7.MP1 J7.MP2 J8.MP1 J8.MP2 J9.MP1 J9.MP2 J10.MP1 J10.MP2 U1.2 U2.4 U2.8 U2.9 U2.12 U2.14 U2.19 U2.27 U2.28 U2.29 U2.35 U2.36 U2.37 U2.38 U2.39 U2.40 U2.41 U2.42 U2.45 U2.46 U2.47 U2.48 U2.49 U2.50 U2.51 U2.52 U2.55 U2.56 U2.57 U2.58 U2.59 U2.60 U2.65 U2.66 U2.67 U2.68 U2.69 U2.70 U2.71 U2.72 U2.73 U2.74 U2.75 U2.79 U2.82 U2.83 U2.84 U2.85 U2.86 U2.87 U2.98 U3.6 U4.6 U5.6 U6.1 U6.10 U6.11 U6.12 U6.15 U6.16 U6.17 U6.18 U6.19 U6.22 U6.24 U7.16

## Polygon pours and split planes (outlines as drawn)
VCC on Signal_1 "VCC_L02_P009" (solid, remove dead copper, pour order 9): 0,1966.23 1772,1965.77 1772,0 0,0
6V on Signal_1 "6V_L02_P001" (solid, remove dead copper, pour order 1): 1400,1558 1400,1482 1769,1482 1769,1848 214,1848 137,1848 137,1558
VCC on Signal_2 "VCC_L03_P010" (solid, remove dead copper, pour order 10): 0,1966.23 1772,1965.77 1772,0 0,0
6V on Signal_2 "NONET_L-01_P-001" (solid, remove dead copper, pour order 7): 1458,1269 1278.91,1269 1278.91,1102.27 1278.91,1096 1278.91,1096.86 1278.91,532.43 1772,532.43 1772,1561 1502,1561 1502,1423 1458,1379
VIN_6V on Signal_2 "VIN_6V_L03_P018" (solid, remove dead copper, pour order 18): 797,992 797,442 13,442 13,655 514,655 514,992
VUSB on Signal_2 "VUSB_L03_P002" (solid, remove dead copper, pour order 2): 1110,1713 1493,1713 1493,1462 1458,1427 779,1427 461,1427 461,1806 1110,1806
GND on Top Layer "GND_L01_P012" (solid, remove dead copper, pour order 12): 0,1966.23 1772,1965.77 1772,0 0,0
VUSB on Top Layer "VUSB_L01_P011" (solid, remove dead copper, pour order 11): 995,1622 995,1667 967,1667 967,1742 993,1742 993,1687 1014,1687 1014,1622
VUSB on Top Layer "VUSB_L01_P005" (solid, remove dead copper, pour order 5): 779,1743 779,1676 754,1676 754,1590 779,1590 779,1644 805,1644 805,1743
GND on Bottom Layer "GND_L04_P008" (solid, remove dead copper, pour order 8): 0,1966.23 1772,1965.77 1772,0 0,0
6V on Bottom Layer "6V_L04_P016" (solid, remove dead copper, pour order 16): 1698.28,801 1146,801 1146,680.52 774.58,680.52 774.58,639.68 857.06,639.68 857.06,568.59 1004.33,568.59 1004.33,403 1110,403 1110,545 1698.28,545
NetR27_1 on Bottom Layer "NETR27_1_L04_P017" (solid, remove dead copper, pour order 17): 715.83,744.99 715.83,830.01 715.83,865.01 745.83,865.01 745.83,830.01 748.59,830.01 748.59,744.99
PG/CCN on Bottom Layer "PG/CCN_L04_P015" (solid, remove dead copper, pour order 15): 748.59,630.82 748.59,556.01 706.55,556.01 706.55,469.51 671.55,469.51 671.55,607.2 724.97,607.2 724.97,630.82
NetC37_2 on Bottom Layer "NETC37_2_L04_P014" (solid, remove dead copper, pour order 14): 404.51,773.95 404.51,691.01 339,691.01 339,409 437,409 437,726 582.67,726 582.67,859.28 541.33,859.28 541.33,773.95
VIN_6V on Bottom Layer "VIN_6V_L04_P013" (solid, remove dead copper, pour order 13): 394.67,705 320,705 320,445 11,445 11,835.65 298,835.65 394.67,835.65

## Other copper
Top Layer:
  rectangle net VIN_6V: 16,443 252,590
  rectangle net VCC: 657,383.05 679,642
  rectangle net VCC: 639,617 779.5,642
  rectangle net VCC#: 554,1474 589,1687
  region net 6V: 481,1600 481,1711 259,1711 259,1600
  rectangle net GND: 1175,1789 1254,1918
  rectangle net CP_VDD: 1298,1481 1333.23,1510
  rectangle net CP_VDD: 1281,1481 1314,1558
  region net SHELL: 738,1897.6 695,1897.6 695,1702 738,1702
  region net SHELL: 1078,1861 1078,1943.91 695,1943.91 695,1861
  rectangle net 6V: 612,1600 632.58,1698
  rectangle net GND: 144,1841 620,1944
  rectangle net SHELL: 1035,1702 1149,1944
  rectangle net VCC: 1490,1755 1753,1825
  rectangle net 6V: 625,1508 684,1698
Bottom Layer:
  rectangle net NetC38_1: 547.79,397 659,681.89
  rectangle net NetC38_1: 547.79,655.6 695.83,683.4
  rectangle net NetC37_2: 574.8,726 695.83,747.24
  rectangle net NetQ1_3: 592.51,841.36 685.83,859.28
  rectangle net NetQ2_3: 404.51,788.36 437,866.01
  rectangle net VCC: 456,1118 569,1151
  rectangle net CP_VDD: 1663,1583 1692,1667
  region net MOTOR6_SENSE: 154,1191 154,1216.43 68,1216.43 68,1191
  region net NetJ15_1: 155,1390 155,1430.29 60,1430.29 60,1390
  region net NetJ18_1: 155,1295 155,1336 60,1336 60,1295
  rectangle net NetJ18_1: 134,1230.3 155.5,1335.3
  rectangle net NetJ15_1: 133,1348 155.5,1453
  rectangle net VCC#: 467,1474 590,1600
  rectangle net GND: 1283.23,1445 1465,1470
  rectangle net VUSB: 1427,1482 1485,1554
  rectangle net VUSB: 1360,1482 1450,1507
  rectangle net CP_VDD: 1281,1481 1354,1510
  rectangle net VUSB: 467,1333 587,1461
  rectangle net VCC: 283,1328 434,1606
  pour cut-out: 339,703 339,397 655.83,397 655.83,703.43 339,703.43

## Silkscreen, mask and mechanical layers (free items; w line width, h text height)
Top Overlay:
  lines w5: 126,1243.2 151.61,1268.82 181.29,1268.82
  lines w7: 1211,1918 1242,1918 1257,1903 1257,1775
  text "GND" at 143.73,1934.37 h35
  text "RST" at 3.44,1829.55 h40 r270
  text "RXD" at 3.44,1736.56 h40 r270
  text "6V" at 143.8,1717.41 h35
  text "SPI" at 1370,1690.6 h40
  text "TXD" at 3.45,1642.55 h40 r270
  text "TX" at 1563,1630.21 h40
  text "RX" at 1563,1573.21 h40
  text "VCC" at 3.45,1547.84 h40 r270
  text "GND" at 140,1546.44 h40
  text "TP8" at 3.45,1452.84 h40 r270
  text "TP9" at 3.45,1357.84 h40 r270
  text "MOTOR6_SENSE" at 156.03,1266.42 h40
  text "VCC" at 40.16,1045.44 h40
  text "GND" at 136,1045.44 h40
  text "PALM_LED" at 1044.06,601.6 h45
  text "LED_PIN" at 1044.06,545.6 h45
  text "PC0" at 1586.5,475.44 h40
  text "VIN-6V" at 102.36,471.44 h40
  text "PC1" at 1587.16,381.44 h40
  text "GND" at 102.33,373.62 h40
Bottom Overlay:
  drawing of 2581 lines, arcs and shapes, not listed
  text "GND" at 343.6,1853 h35
  text "6V" at 342.95,1752.5 h35
  text "~" at 211.71,1169.97 h70
  text "~" at 21.26,689.97 h70
  text "V2.2" at 1771.57,2.7 h45
Board Outline:
  circle w20: c1322.5,78.75 r39.37
  circle w20: c1693.25,1887.25 r39.37
  circle w20: c78.75,1887.25 r39.37
  circle w20: c437,78.75 r39.37
  circle w20: c879.75,78.75 r39.37
  lines w20: 0,0 1772,0 1772,1966 0,1966 0,0
Fabrication:
  drawing of 295 lines, arcs and shapes, not listed
  text "Layer" at 1974.34,4171 h60
  text "Name" at 2384.26,4171 h60
  text "Material" at 3314,4171 h60
  text "Thickness" at 4173.77,4171 h60
  text "Constant" at 4823.6,4171 h60
  text "Board Layer Stack" at 5393.46,4171 h60
  text "Top Overlay" at 2384.26,4051 h60
  text "Top Solder" at 2384.26,3931 h60
  text "Solder Resist" at 3314,3931 h60
  text "0.39mil" at 4173.77,3931 h60
  text "3.5" at 4823.6,3931 h60
  text "1" at 1974.34,3811 h60
  text "Top Layer" at 2384.26,3811 h60
  text "1.38mil" at 4173.77,3811 h60
  text "Dielectric 2" at 2384.26,3691 h60
  text "PP-006" at 3314,3691 h60
  text "8.27mil" at 4173.77,3691 h60
  text "4.1" at 4823.6,3691 h60
  text "2" at 1974.34,3571 h60
  text "Signal_1" at 2384.26,3571 h60
  text "CF-004" at 3314,3571 h60
  text "0.39mil" at 4173.77,3571 h60
  text "Dielectric 1" at 2384.26,3451 h60
  text "FR-4" at 3314,3451 h60
  text "41.93mil" at 4173.77,3451 h60
  text "4.8" at 4823.6,3451 h60
  text "3" at 1974.34,3331 h60
  text "Signal_2" at 2384.26,3331 h60
  text "CF-004" at 3314,3331 h60
  text "0.39mil" at 4173.77,3331 h60
  text "Dielectric 3" at 2384.26,3211 h60
  text "PP-006" at 3314,3211 h60
  text "8.27mil" at 4173.77,3211 h60
  text "4.1" at 4823.6,3211 h60
  text "4" at 1974.34,3091 h60
  text "Bottom Layer" at 2384.26,3091 h60
  text "1.38mil" at 4173.77,3091 h60
  text "Bottom Solder" at 2384.26,2971 h60
  text "Solder Resist" at 3314,2971 h60
  text "0.39mil" at 4173.77,2971 h60
  text "3.5" at 4823.6,2971 h60
  text "Bottom Overlay" at 2384.26,2851 h60
  text "Total board thickness:" at 1974.34,2731 h60
  text "62.80mil" at 4173.77,2731 h60
Drill Drawing:
  circle w10: c2016.25,1852.33 r33.33
  lines w10: 1982.92,1385.67 1999.58,1385.67 2016.25,1369 2032.92,1385.67 2049.58,1385.67 2032.92,1402.33 2049.58,1419 2032.92,1419 2016.25,1435.67 1999.58,1419 1982.92,1419 1999.58,1402.33 1982.92,1385.67 ; 1982.92,1519 2016.25,1535.67 2049.58,1519 2032.92,1552.33 2049.58,1585.67 2016.25,1569 1982.92,1585.67 1999.58,1552.33 1982.92,1519 ; 1982.92,1669 2049.58,1669 2049.58,1735.67 1982.92,1735.67 1982.92,1669 ; 1982.92,2035.67 2049.58,2035.67 2016.25,1969 1982.92,2035.67 ; 1982.92,2135.67 1999.58,2135.67 1999.58,2119 2032.92,2119 2032.92,2135.67 2049.58,2135.67 2049.58,2169 2032.92,2169 2032.92,2185.67 1999.58,2185.67 1999.58,2169 1982.92,2169 1982.92,2135.67
  lines w15: 1923.12,1324 15401.32,1324 ; 1923.12,2224 15401.32,2224 ; 2474,1174 2474,2374 ; 3073.84,1174 3073.84,2374 ; 4173.52,1174 4173.52,2374 ; 4679.4,1174 4679.4,2374 ; 5413.2,1174 5413.2,2374 ; 6912.75,1174 6912.75,2374 ; 7502.6,1174 7502.6,2374 ; 8248.4,1174 8248.4,2374 ; 9388.06,1174 9388.06,2374 ; 10241.83,1174 10241.83,2374 ; 11575.43,1174 11575.43,2374 ; 12909.04,1174 12909.04,2374 ; 13998.72,1174 13998.72,2374 ; 1923.12,1174 15401.32,1174 15401.32,2374 1923.12,2374 1923.12,1174
  text "Symbol" at 2013.12,2269 h72
  text "Count" at 2519,2269 h72
  text "Hole Size" at 3118.84,2269 h72
  text "Plated" at 4218.52,2269 h72
  text "Hole Type" at 4724.4,2269 h72
  text "Drill Layer Pair" at 5458.2,2269 h72
  text "Via/Pad" at 6957.75,2269 h72
  text "Pad Shape" at 7547.6,2269 h72
  text "Template" at 8293.4,2269 h72
  text "Description" at 9433.06,2269 h72
  text "Hole Tolerance (+)" at 10286.83,2269 h72
  text "Hole Tolerance (-)" at 11620.43,2269 h72
  text "Hole Length" at 12954.04,2269 h72
  text "Routed Path Length" at 14043.72,2269 h72
  text "2" at 2519,2119 h60
  text "0.600mm (23.62mil)" at 3118.84,2119 h60
  text "PTH" at 4218.52,2119 h60
  text "Slot" at 4724.4,2119 h60
  text "Top Layer - Bottom Layer" at 5458.2,2119 h60
  text "Pad" at 6957.75,2119 h60
  text "Rounded" at 7547.6,2119 h60
  text "r90_170h60_140r100" at 8293.4,2119 h60
  text "1.400mm (55.12mil)" at 12954.04,2119 h60
  text "0.800mm (31.50mil)" at 14043.72,2119 h60
  text "2" at 2519,1969 h60
  text "0.600mm (23.62mil)" at 3118.84,1969 h60
  text "PTH" at 4218.52,1969 h60
  text "Slot" at 4724.4,1969 h60
  text "Top Layer - Bottom Layer" at 5458.2,1969 h60
  text "Pad" at 6957.75,1969 h60
  text "Rounded" at 7547.6,1969 h60
  text "(Mixed)" at 8293.4,1969 h60
  text "1.700mm (66.93mil)" at 12954.04,1969 h60
  text "1.100mm (43.31mil)" at 14043.72,1969 h60
  text "2" at 2519,1819 h60
  text "0.620mm (24.41mil)" at 3118.84,1819 h60
  text "NPTH" at 4218.52,1819 h60
  text "Round" at 4724.4,1819 h60
  text "Top Layer - Bottom Layer" at 5458.2,1819 h60
  text "Pad" at 6957.75,1819 h60
  text "Rounded" at 7547.6,1819 h60
  text "c0hn62" at 8293.4,1819 h60
  text "-" at 12954.04,1819 h60
  text "-" at 14043.72,1819 h60
  text "6" at 2519,1669 h60
  text "1.020mm (40.16mil)" at 3118.84,1669 h60
  text "PTH" at 4218.52,1669 h60
  text "Round" at 4724.4,1669 h60
  text "Top Layer - Bottom Layer" at 5458.2,1669 h60
  text "Pad" at 6957.75,1669 h60
  text "(Mixed)" at 7547.6,1669 h60
  text "(Mixed)" at 8293.4,1669 h60
  text "-" at 12954.04,1669 h60
  text "-" at 14043.72,1669 h60
  text "16" at 2519,1519 h60
  text "0.920mm (36.22mil)" at 3118.84,1519 h60
  text "PTH" at 4218.52,1519 h60
  text "Round" at 4724.4,1519 h60
  text "Top Layer - Bottom Layer" at 5458.2,1519 h60
  text "Pad" at 6957.75,1519 h60
  text "Octagonal" at 7547.6,1519 h60
  text "s180h92c50" at 8293.4,1519 h60
  text "-" at 12954.04,1519 h60
  text "-" at 14043.72,1519 h60
  text "277" at 2519,1369 h60
  text "0.300mm (11.81mil)" at 3118.84,1369 h60
  text "PTH" at 4218.52,1369 h60
  text "Round" at 4724.4,1369 h60
  text "Top Layer - Bottom Layer" at 5458.2,1369 h60
  text "Via" at 6957.75,1369 h60
  text "Rounded" at 7547.6,1369 h60
  text "(Mixed)" at 8293.4,1369 h60
  text "-" at 12954.04,1369 h60
  text "-" at 14043.72,1369 h60
  text "305 Total" at 2519,1219 h60
  text "Slot definitions :" at 2013.12,1074.03 h60
  text "Routed Path Length" at 3045.81,1074.03 h60
  text "= Calculated from tool start centre position to tool end centre position." at 4148.48,1074.03 h60
  text "Hole Length" at 3045.81,974.05 h60
  text "= Routed Path Length + Tool Size = Slot length as defined in the PCB layout" at 3738.61,974.05 h60

## Dimensions
0,1966 to 0,0 on Dimension
1772,1966 to 0,0 on Dimension

## Text inside footprints (layer, text, board x,y; h text height)
J4: Top Overlay "PCB Edge" at 938.69,1931.04 h31.5 r180